# Altium PCB Dockboard-v1.0.0.PcbDoc
Units mm, origin at the board's own origin, x right, y up, seen from the top; angles counter-clockwise.
Board outline 25 x 12 mm, 2 copper layers (Top Layer, Bottom Layer), stack 1.67 mm thick; 3 components, 2 nets, 5 pads, 0 vias.
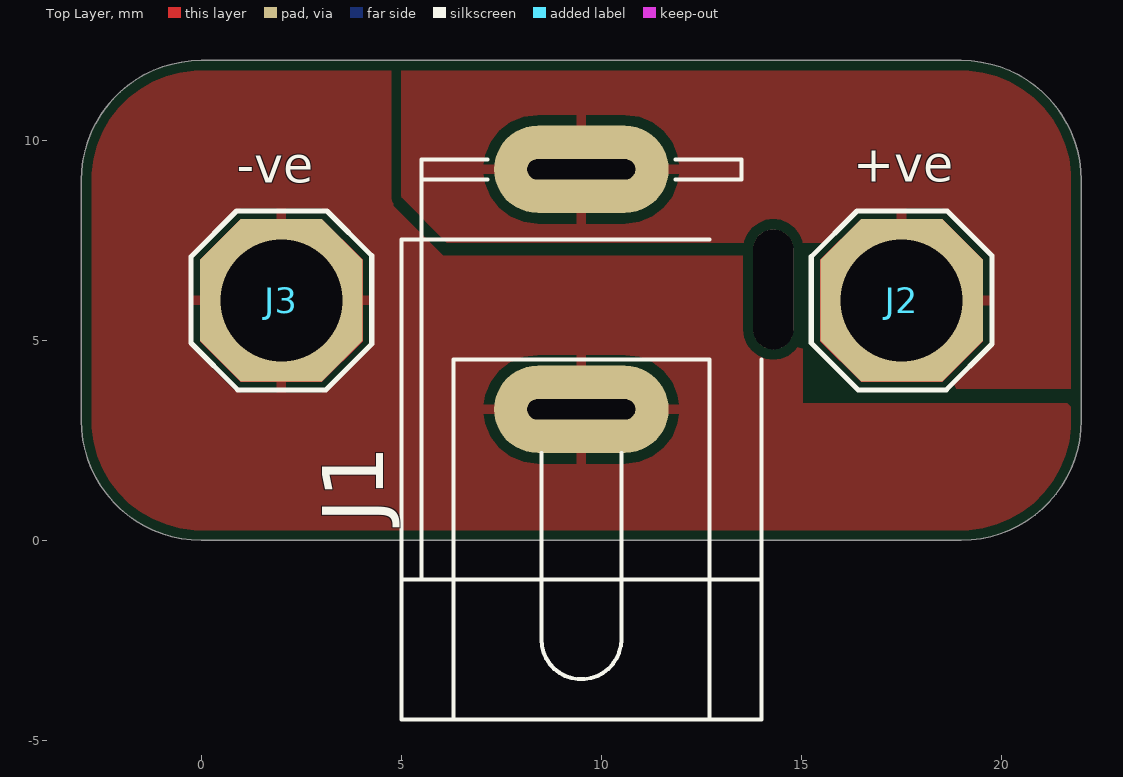
[diagram p0: Top Layer view]
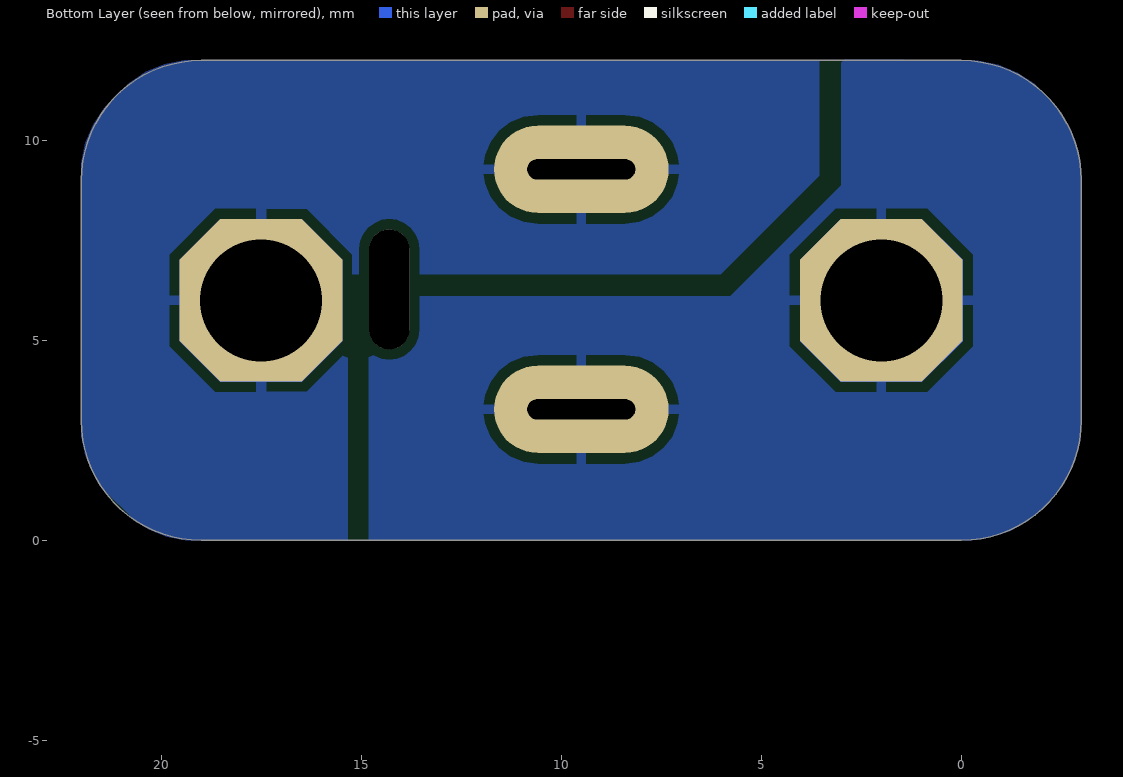
[diagram p1: Bottom Layer view, seen from below]

## Layer stack, top to bottom
Top Solder: solder mask 0.01, Solder Resist, Dk 3.5
Top Layer: signal copper 0.035
Dielectric 1: dielectric 1.6, FR-4, Dk 4.8
Bottom Layer: signal copper 0.035
Bottom Solder: solder mask 0.01, Solder Resist, Dk 3.5

## Board outline
0,0 cw(c0,3) -3,3 -3,9 cw(c0,9) 0,12 19,12 cw(c19,9) 22,9 22,3 cw(c19,3) 19,0

## Design rules (kind name [scope] priority, off if disabled: settings)
BoardOutlineClearance [All] p1: gap=0 ignorepadtopadclearanceinfootprint=FALSE except(0.254: Fill-OutlineEdge)
Clearance [All] p1: gap=0.254 ignorepadtopadclearanceinfootprint=FALSE except(0: Arc-Hole Track-Hole SMDPad-Hole THPad-Hole Via-Hole Fill-Hole Poly-Hole Region-Hole Text-Hole)
HoleSize [All] p1: absolutevalues=TRUE maxlimit=25.4 minlimit=0.025 maxpercent=80.000 minpercent=20.000
PolygonConnect [All] p1: connectstyle=Relief reliefconductorwidth=0.254 reliefentries=4 polygonreliefangle="90 Angle" airgapwidth=0.254
RoutingVias [All] p1: holewidth=0.711 width=1.27 viastyle="Through Hole" minholewidth=0.711 minwidth=1.27 maxholewidth=0.711 maxwidth=1.27
SilkToSolderMaskClearance [IsPad] p1: minsilkscreentomaskgap=0.102 clearancetoexposedcopper=TRUE
SolderMaskExpansion [All] p1: expansion=0.102 istentingtop=FALSE
Width [All] p1: maxlimit=0.254 minlimit=0.254 preferedwidth=0.254
28 further rules are at their usual default settings.

## Components (designator, comment, footprint, x,y, rotation, side; value= is the part's Value field where it differs from the comment)
J1 "CON-JACK_JACK-PLUG0" CON-JACK_JACK-PLUG0 9.5,3.276 r0 top
J2 "1P Through_Hole_Pad" "Through Hole 1 Pad" 17.508,6 r0 top
J3 "1P Through_Hole_Pad" "Through Hole 1 Pad" 2,6 r0 top

## Footprints (in the part's own frame and the unit in brackets; to place one, negate y for a bottom-side part, rotate by r counter-clockwise, add the part's x,y. Pads: shape width x height; smd on the part's side, far side on the other; paste and mask are expansions set on the pad)
CON-JACK_JACK-PLUG0 [mm]
  oval 4.369x2.184 hole 0.5 slot 2.7 at 0 deg mask+0.05: 1(0,0) 3(0,6)
  oval 1x3 hole 1 slot 3 at 90 deg mask+0.05: ""(4.8,3)
  silkscreen extent -4.5,-7.75 4.5,6.25
"Through Hole 1 Pad" [mil]
  oct 160x160 hole 120.08: 1(0,0)
  Top Layer region: -40,-80 -80,-40 -80,40 -40,80 40,80 80,40 80,-40 40,-80
  Bottom Layer region: -40,-80 -80,-40 -80,40 -40,80 40,80 80,40 80,-40 40,-80
  silkscreen extent -89,-88 89,88

## Part data
J1: "DC POWER JACK Power Jack, DC, Right Angle, Through Hole, Rated 5A at 16VDC, PC Terminals", Item Type="DC Jack"
J2 J3: "Wire Connecting Pad"

## Nets (pads, with @x,y where several pads share a name; then routed paths per layer and width w, separated by ;. In a path a pad name is that pad's centre, name@x,y a point inside that pad or via, vN(x,y) a via of type N, cw(c..) or ccw(c..) an arc to the next point about the centre after c; other vN are vias at no path point)
NetJ1_1: J1.1 J3.1
NetJ1_3: J1.3 J2.1
pads on no net: J1.

## Polygon pours and split planes (outlines as drawn)
NetJ1_1 on Top Layer "Polygon_1_Net_N$3" (solid, remove dead copper, pour order 2): -3,0 22,0 22,3.432 15.037,3.426 15.037,7.114 6.052,7.114 4.801,8.365 4.801,12 -3,12
NetJ1_3 on Top Layer "Polygon_1_Net_N$2" (solid, remove dead copper, pour order 0): 5.004,12 5.004,8.581 6.141,7.444 15.647,7.444 15.647,3.786 22,3.786 22,12
NetJ1_1 on Bottom Layer "Polygon_2_Net_N$3" (solid, remove dead copper, pour order 1): -3,3 ccw(c-0.057,3) -2.138,0.919 -1.982,0.762 ccw(c-0.07,2.773) 0,0 14.815,0 14.815,6.098 5.772,6.098 2.998,8.873 2.998,12.028 0,12 -0.161,11.993 ccw(c-0.161,9.389) -2.003,11.231 -2.128,11.106 ccw(c-0.022,9) -3,9
NetJ1_3 on Bottom Layer "Polygon_2_Net_N$2" (solid, remove dead copper, pour order 3): 19.152,12 19.181,12 cw(c19.181,9.46) 20.977,11.256 21.252,10.98 cw(c19.456,9.184) 21.996,9.184 22,8.941 22,3.327 21.996,2.881 cw(c19.452,2.883) 21.247,1.079 20.882,0.715 cw(c19.157,2.441) 19.157,0 15.344,0 15.344,6.657 6.014,6.657 3.557,9.114 3.557,12
no net on Board Outline "NONET_L-01_P-001" (none): 19,0 ccw(c19,3) 22,3 22,9 ccw(c19,9) 19,12 18.999,12

## Silkscreen, mask and mechanical layers (free items; w line width, h text height)
Top Overlay:
  text "+ve" at 16.295,8.665 h1.52
  text "-ve" at 0.889,8.636 h1.52
Fabrication:
  drawing of 191 lines, arcs and shapes, not listed
  text "Layer" at 27.39,7.899 h1.52
  text "Name" at 37.802,7.899 h1.52
  text "Material" at 61.417,7.899 h1.52
  text "Thickness" at 83.255,7.899 h1.52
  text "Constant" at 99.761,7.899 h1.52
  text "Board Layer Stack" at 114.236,7.899 h1.52
  text "Top Overlay" at 37.802,4.851 h1.52
  text "Top Solder" at 37.802,1.803 h1.52
  text "Solder Resist" at 61.417,1.803 h1.52
  text "0.39mil" at 83.255,1.803 h1.52
  text "3.5" at 99.761,1.803 h1.52
  text "1" at 27.39,-1.245 h1.52
  text "Top Layer" at 37.802,-1.245 h1.52
  text "1.38mil" at 83.255,-1.245 h1.52
  text "Dielectric 1" at 37.802,-4.293 h1.52
  text "FR-4" at 61.417,-4.293 h1.52
  text "62.99mil" at 83.255,-4.293 h1.52
  text "4.8" at 99.761,-4.293 h1.52
  text "2" at 27.39,-7.341 h1.52
  text "Bottom Layer" at 37.802,-7.341 h1.52
  text "1.38mil" at 83.255,-7.341 h1.52
  text "Bottom Solder" at 37.802,-10.389 h1.52
  text "Solder Resist" at 61.417,-10.389 h1.52
  text "0.39mil" at 83.255,-10.389 h1.52
  text "3.5" at 99.761,-10.389 h1.52
  text "Bottom Overlay" at 37.802,-13.437 h1.52
  text "Total board thickness:" at 27.39,-16.485 h1.52
  text "66.54mil" at 83.255,-16.485 h1.52
Board Outline:
  the board outline again, w0.254
Drill Drawing:
  circle w0.254: c27.721,30.819 r0.847
  lines w0.254: 26.874,26.162 28.567,26.162 28.567,27.855 26.874,27.855 26.874,26.162 ; 26.874,35.475 28.567,35.475 27.721,33.782 26.874,35.475
  lines w0.381: 25.355,25.019 229.312,25.019 ; 25.355,36.449 229.312,36.449 ; 39.348,21.209 39.348,40.259 ; 51.537,21.209 51.537,40.259 ; 80.738,21.209 80.738,40.259 ; 93.587,21.209 93.587,40.259 ; 112.226,21.209 112.226,40.259 ; 150.314,21.209 150.314,40.259 ; 165.297,21.209 165.297,40.259 ; 184.24,21.209 184.24,40.259 ; 25.355,21.209 229.312,21.209 229.312,40.259 25.355,40.259 25.355,21.209
  text "Symbol" at 27.641,37.592 h1.83
  text "Count" at 40.491,37.592 h1.83
  text "Hole Size" at 52.68,37.592 h1.83
  text "Plated" at 81.881,37.592 h1.83
  text "Hole Type" at 94.73,37.592 h1.83
  text "Drill Layer Pair" at 113.369,37.592 h1.83
  text "Via/Pad" at 151.457,37.592 h1.83
  text "Pad Shape" at 166.44,37.592 h1.83
  text "Template" at 185.383,37.592 h1.83
  text "2" at 40.491,33.782 h1.52
  text "19.69mil (0.500mm)" at 52.68,33.782 h1.52
  text "PTH" at 81.881,33.782 h1.52
  text "Slot" at 94.73,33.782 h1.52
  text "Top Layer - Bottom Layer" at 113.369,33.782 h1.52
  text "Pad" at 151.457,33.782 h1.52
  text "Rounded" at 166.44,33.782 h1.52
  text "r218_437h50_270r100m223_442" at 185.383,33.782 h1.52
  text "1" at 40.491,29.972 h1.52
  text "39.37mil (1.000mm)" at 52.68,29.972 h1.52
  text "PTH" at 81.881,29.972 h1.52
  text "Slot" at 94.73,29.972 h1.52
  text "Top Layer - Bottom Layer" at 113.369,29.972 h1.52
  text "Pad" at 151.457,29.972 h1.52
  text "Rounded" at 166.44,29.972 h1.52
  text "r100_300h100_300r100m105_305" at 185.383,29.972 h1.52
  text "2" at 40.491,26.162 h1.52
  text "120.08mil (3.050mm)" at 52.68,26.162 h1.52
  text "PTH" at 81.881,26.162 h1.52
  text "Round" at 94.73,26.162 h1.52
  text "Top Layer - Bottom Layer" at 113.369,26.162 h1.52
  text "Pad" at 151.457,26.162 h1.52
  text "Octagonal" at 166.44,26.162 h1.52
  text "s406h305c50" at 185.383,26.162 h1.52
  text "5 Total" at 40.491,22.352 h1.52
  text "Slot definitions :" at 27.641,18.67 h1.52
  text "Routed Path Length" at 53.872,18.67 h1.52
  text "= Calculated from tool start centre position to tool end centre position." at 81.879,18.67 h1.52
  text "Hole Length" at 53.872,16.13 h1.52
  text "= Routed Path Length + Tool Size = Slot length as defined in the PCB layout" at 71.469,16.13 h1.52